# Altium PCB MVP-Module-Dash-v2.0.PcbDoc (part 1 of 6)
Units mil, origin at the board's own origin, x right, y up, seen from the top; angles counter-clockwise.
Board outline 5314.96 x 3937.01 mil, 4 copper layers (Top, GND, PWR, Bottom), stack 60.118 mil thick; 364 components, 288 nets, 1223 pads, 0 vias.
Unrouted connection lines stored in the file: 976.
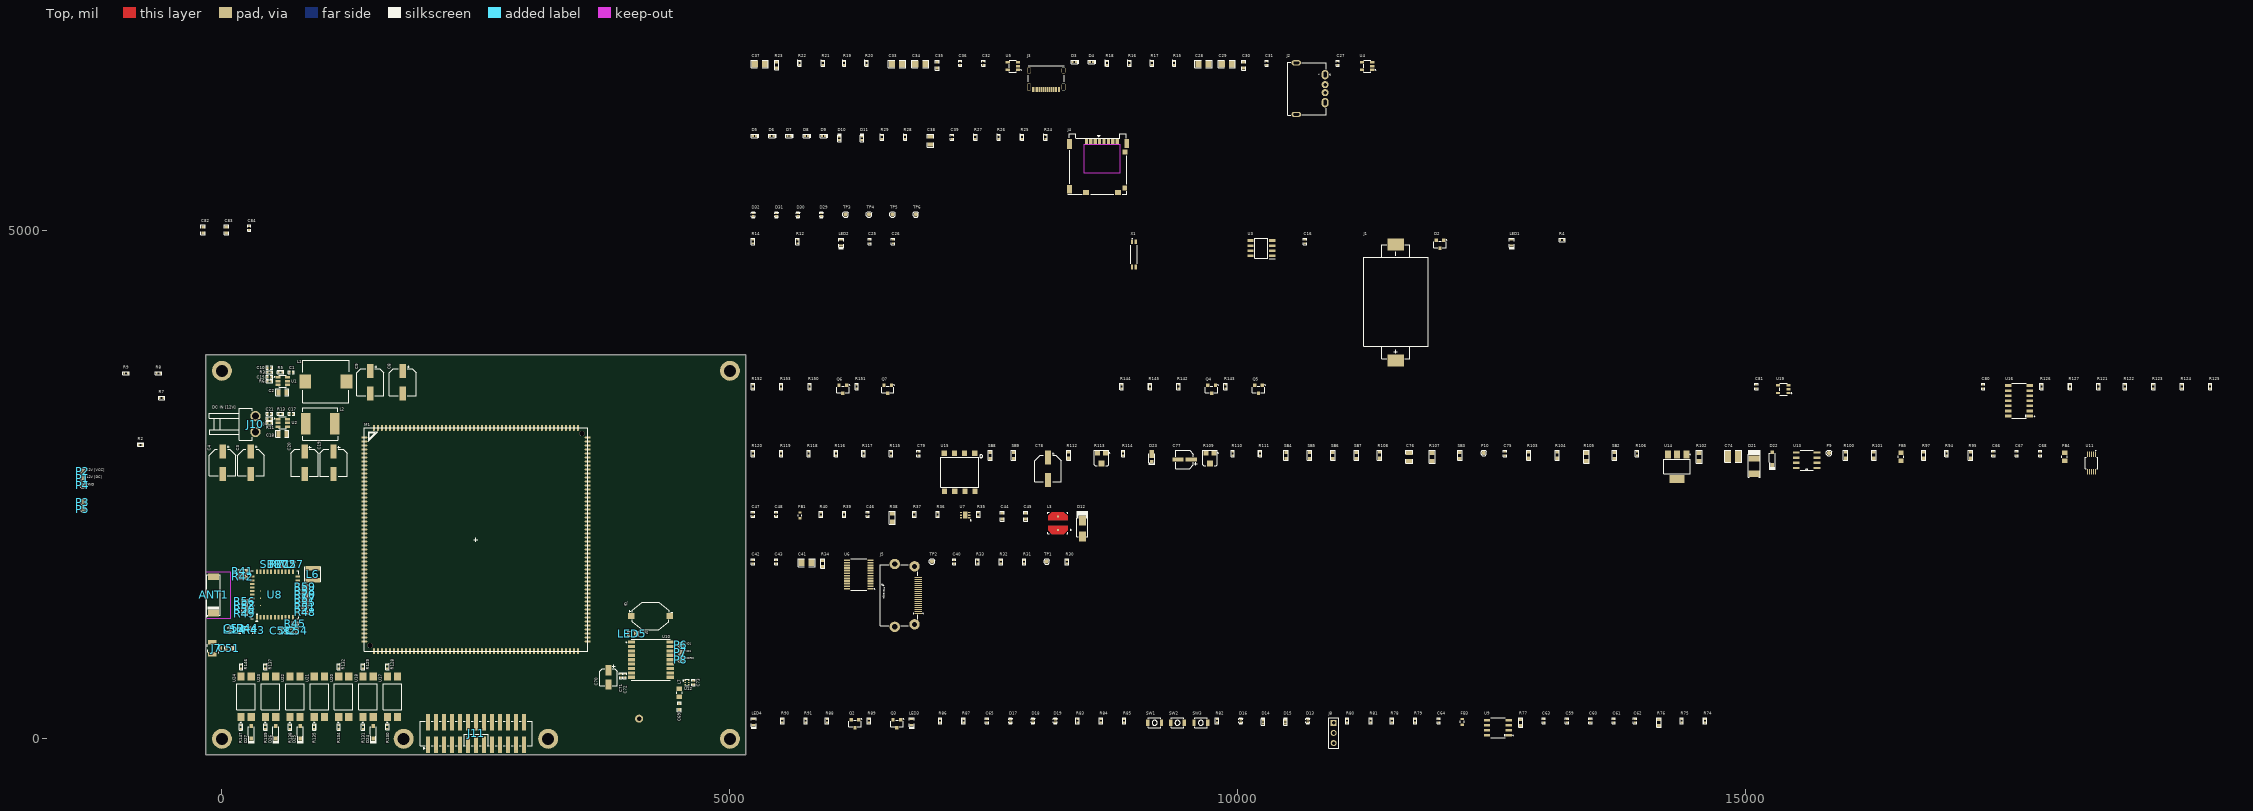
[diagram p0: Top view]
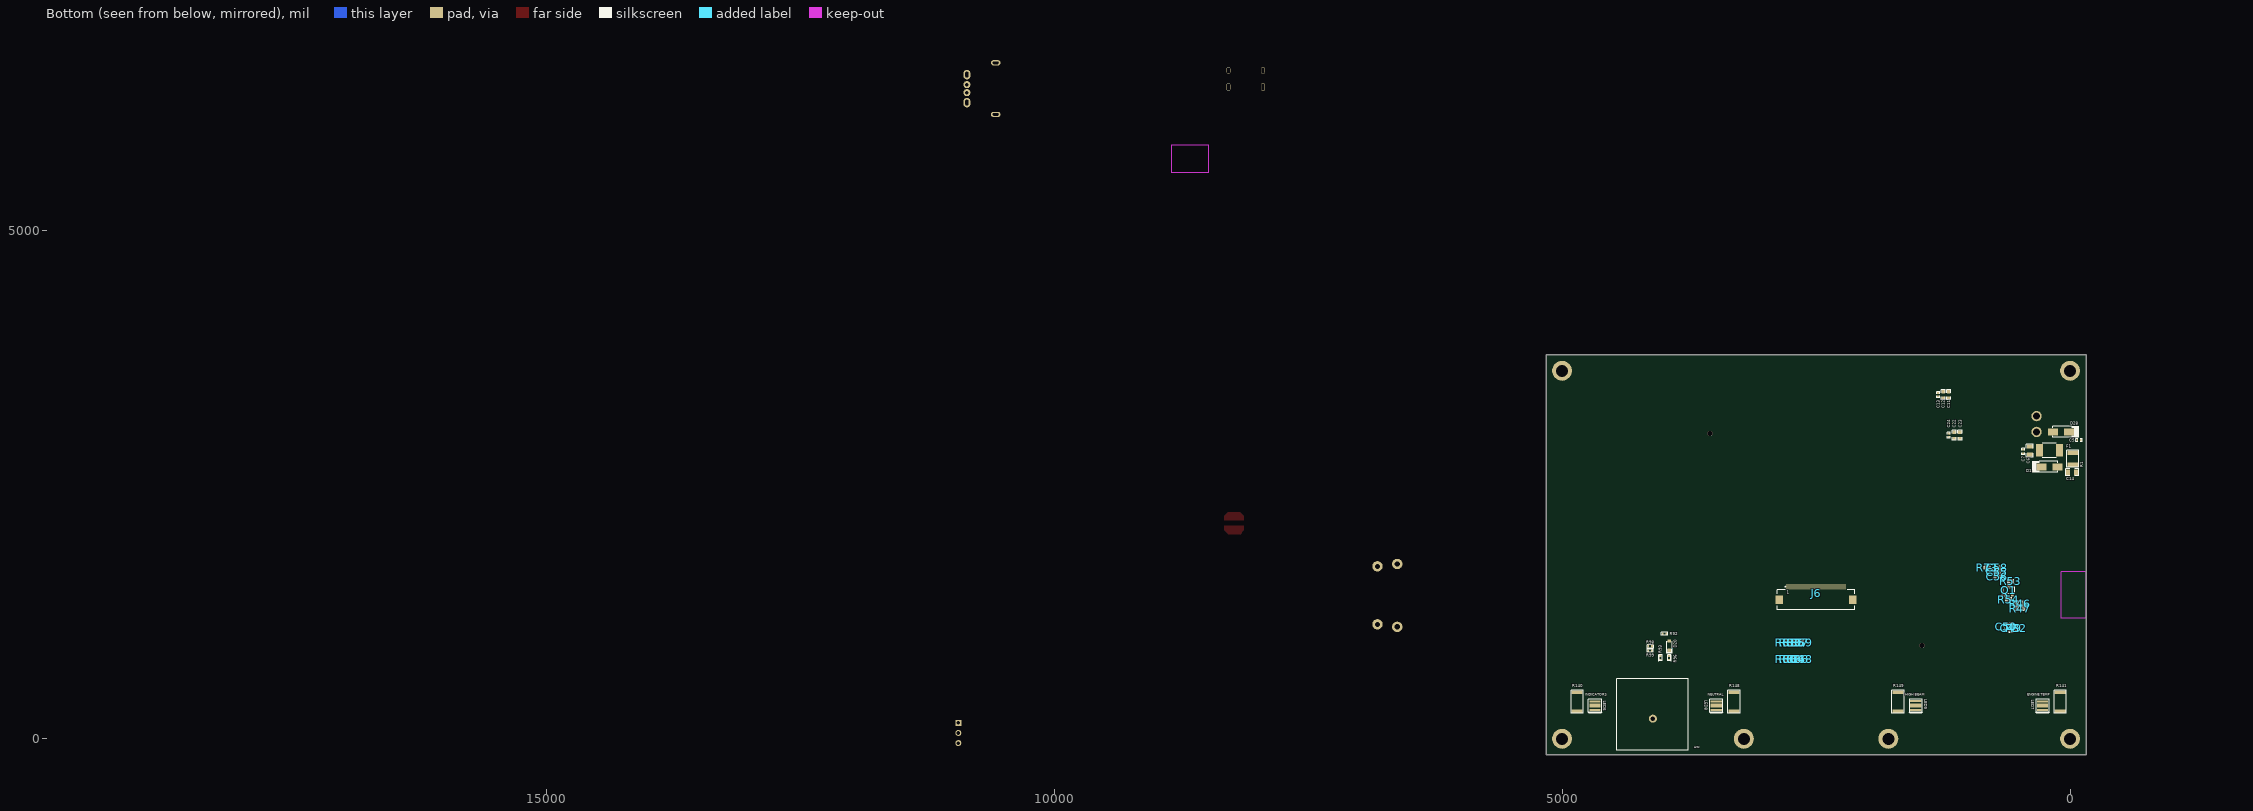
[diagram p1: Bottom view, seen from below]

## Layer stack, top to bottom
Top Solder: solder mask 1.5748, Solder Resist, Dk 3.5
Top: signal copper 0.689
Dielectric 1: prepreg 7.7165, PP-006, Dk 4.1
GND: signal copper 1.378
Core 02: prepreg 40.5512, FR-4, Dk 4.8
PWR: signal copper 1.378
Dielectric 2: prepreg 7.7165, PP-006, Dk 4.1
Bottom: signal copper 0.689
Bottom Solder: solder mask 1.5748, Solder Resist, Dk 3.5

## Board outline
-157.48,-157.48 5157.48,-157.48 5157.48,3779.53 -157.48,3779.53

## Design rules (kind name [scope] priority, off if disabled: settings)
Clearance Clearance_BGA [WithinRoom('Rockchip') OR WithinRoom('LPDDR4x')] p1: gap=4 ignorepadtopadclearanceinfootprint=FALSE
Clearance [All] p2: gap=5 ignorepadtopadclearanceinfootprint=FALSE
ComponentClearance [All] p1: gap=0 collisioncheckmode=3 verticalgap=0 showdistances=FALSE
DiffPairsRouting "MIPI 100OHM" [InDifferentialPairClass('MIPI')] p1: maxlimit=10 minlimit=5 mostfreqgap=5 toplayer_maxgap=5 toplayer_minwidth=5 toplayer_maxwidth=5 toplayer_prefwidth=5 bottomlayer_maxgap=5 bottomlayer_minwidth=5 bottomlayer_maxwidth=5 bottomlayer_prefwidth=5 impedanceprofiledriven=TRUE impedanceprofileid={6A727FEC-7230-4ECD-AF1B-DB85D48FF7C8} impedanceprofilevalue=100.000000 maxuncoupledlength=500
DiffPairsRouting "CAN 120OHM" [InDifferentialPairClass('CAN')] p2: maxlimit=10 minlimit=5 mostfreqgap=10 toplayer_mingap=10 toplayer_minwidth=5 toplayer_maxwidth=5 toplayer_prefwidth=5 bottomlayer_mingap=10 bottomlayer_minwidth=5 bottomlayer_maxwidth=5 bottomlayer_prefwidth=5 impedanceprofiledriven=TRUE impedanceprofileid={15A29312-FF26-4CC1-9788-E730C5FA9E7F} impedanceprofilevalue=120.000000 maxuncoupledlength=500
DiffPairsRouting "LPDDR4x DQS 100OHM" [InDifferentialPairClass('100OHM_DDR_DQS')] p3: maxlimit=9 minlimit=5 mostfreqgap=6 toplayer_maxgap=5 toplayer_prefgap=5 toplayer_minwidth=5 toplayer_maxwidth=5 toplayer_prefwidth=5 bottomlayer_maxgap=5 bottomlayer_prefgap=5 bottomlayer_minwidth=5 bottomlayer_maxwidth=5 bottomlayer_prefwidth=5 impedanceprofiledriven=TRUE impedanceprofileid={C2BF5852-FECA-45EF-94D3-E6317939363F} impedanceprofilevalue=100.000000 maxuncoupledlength=500
DiffPairsRouting "LPDDR4x CLK 100OHM" [InDifferentialPairClass('100OHM_DDR_CLK')] p4: maxlimit=9 minlimit=5 mostfreqgap=6 toplayer_maxgap=5 toplayer_prefgap=5 toplayer_minwidth=5 toplayer_maxwidth=5 toplayer_prefwidth=5 bottomlayer_maxgap=5 bottomlayer_prefgap=5 bottomlayer_minwidth=5 bottomlayer_maxwidth=5 bottomlayer_prefwidth=5 impedanceprofiledriven=TRUE impedanceprofileid={D17F236E-1DDD-45C0-BCE1-C69412D26291} impedanceprofilevalue=100.000000 maxuncoupledlength=500
DiffPairsRouting DiffPairs-USB90 [InDifferentialPairClass('USB')] p5: maxlimit=5 minlimit=5 mostfreqgap=5 toplayer_minwidth=6.8 toplayer_maxwidth=6.8 toplayer_prefwidth=9.27 bottomlayer_minwidth=6.8 bottomlayer_maxwidth=6.8 bottomlayer_prefwidth=9.27 impedanceprofiledriven=TRUE impedanceprofileid={DEE51EC6-B459-40BC-A745-2675CA147182} impedanceprofilevalue=90.000000 maxuncoupledlength=500
HoleSize [All] p1: absolutevalues=TRUE maxlimit=120 minlimit=1 maxpercent=80.000 minpercent=20.000
MatchedLengths "Schematic Matched Net Lengths_1" [InDifferentialPairClass('DIFF_HDMI_100')] p1: tolerance=20 checknetsindiffpair=TRUE checkdiffpairvsdiffpair=FALSE checkxsignals=FALSE checkothers=FALSE
MatchedLengths "Schematic Matched Net Lengths" [InDifferentialPairClass('HDMI100')] p2: tolerance=20 checknetsindiffpair=TRUE checkdiffpairvsdiffpair=FALSE checkxsignals=FALSE checkothers=FALSE
MatchedLengths [InDifferentialPairClass('MIPI')] p3: tolerance=12 checknetsindiffpair=TRUE checkdiffpairvsdiffpair=FALSE checkxsignals=FALSE checkothers=FALSE
MatchedLengths HDMI [InDifferentialPairClass('HDMI100')] p4: tolerance=10 checknetsindiffpair=TRUE checkdiffpairvsdiffpair=FALSE checkxsignals=FALSE checkothers=FALSE
MatchedLengths "DDR DQS" [InDifferentialPairClass('100OHM_DDR_DQS')] p5: tolerance=1000 checknetsindiffpair=FALSE checkdiffpairvsdiffpair=TRUE checkxsignals=TRUE checkothers=TRUE usedelayunits=TRUE delaytolerance=1.000000
MatchedLengths "DDR DataLines(DQ)" [InNetClass('A_DQ[15..0]') or InNetClass('B_DQ[15..0]')] p6: tolerance=1000 checknetsindiffpair=FALSE checkdiffpairvsdiffpair=TRUE checkxsignals=TRUE checkothers=TRUE usedelayunits=TRUE delaytolerance=5.000000
MatchedLengths "DDR CLK Matching" [InDifferentialPair('A_CLK') or InDifferentialPair('B_CLK')] p7: tolerance=1000 checknetsindiffpair=FALSE checkdiffpairvsdiffpair=TRUE checkxsignals=TRUE checkothers=TRUE usedelayunits=TRUE delaytolerance=5.000000
MatchedLengths "EMMC Delay Matching" [InNetClass('eMMC_DATA[7..0]')    OR InNet('eMMC_CLK')] p8: tolerance=20 checknetsindiffpair=FALSE checkdiffpairvsdiffpair=TRUE checkxsignals=TRUE checkothers=TRUE usedelayunits=TRUE delaytolerance=10.000000
MaxMinImpedance "Schematic Impedance Constraint_7" [InDifferentialPairClass('CAN')] p1: minimum=117.0 maximum=123.0
MaxMinImpedance "Schematic Impedance Constraint_6" [InDifferentialPairClass('HDMI100')] p2: minimum=98.00 maximum=102.0
MaxMinImpedance "Schematic Impedance Constraint_5" [InDifferentialPairClass('DIFF_HDMI_100')] p3: minimum=98.00 maximum=102.0
MaxMinImpedance "Schematic Impedance Constraint_4" [InDifferentialPairClass('MIPI')] p4: minimum=97.00 maximum=103.0
MaxMinImpedance "Schematic Impedance Constraint_3" [InDifferentialPairClass('USB')] p5: minimum=87.00 maximum=93.00
MinimumSolderMaskSliver [All] p1: minsoldermaskwidth=0
PolygonConnect [All] p1: thpad.connectstyle=Relief thpad.reliefconductorwidth=15 thpad.reliefentries=4 thpad.polygonreliefangle="45 Angle" thpad.airgapwidth=10 smdpad.connectstyle=Direct smdpad.reliefconductorwidth=15 smdpad.reliefentries=4 smdpad.polygonreliefangle="45 Angle" smdpad.airgapwidth=10 via.connectstyle=Direct via.reliefconductorwidth=15 via.reliefentries=4 via.polygonreliefangle="45 Angle" via.airgapwidth=10
RoutingVias RoutingVias_BGA [WithinRoom('Rockchip') OR WithinRoom('LPDDR4x')] p1: holewidth=6 width=12 viastyle="Through Hole" minholewidth=6 minwidth=12 maxholewidth=6 maxwidth=12
RoutingVias [All] p2: holewidth=7.87 width=15.75 viastyle="Through Hole" minholewidth=6 minwidth=12 maxholewidth=11.81 maxwidth=23.62
SilkToSilkClearance [All] p1: silktosilkclearance=0
SilkToSolderMaskClearance [IsPad] p1: minsilkscreentomaskgap=0 clearancetoexposedcopper=TRUE
SolderMaskExpansion [All] p1: expansion=4 istentingtop=FALSE
SupplyNets "Schematic Supply Nets_42" [InNet('VCC_3V3_LCD')] p1: voltage=0.000
SupplyNets "Schematic Supply Nets_41" [InNet('VCC_5V0')] p2: voltage=0.000
SupplyNets "Schematic Supply Nets_40" [InNet('HDMI1_VDISP')] p3: voltage=0.000
SupplyNets "Schematic Supply Nets_39" [InNet('VCC5V0_USB_OTG0')] p4: voltage=0.000
SupplyNets "Schematic Supply Nets_34" [InNet('DC_IN_12V')] p5: voltage=0.000
SupplyNets "Schematic Supply Nets_31" [InNet('VCC12V_DCIN')] p6: voltage=0.000
SupplyNets "Schematic Supply Nets_30" [InNet('VCC5V0_USB20_HOST')] p7: voltage=0.000
SupplyNets "Schematic Supply Nets_27" [InNet('VCC5V0_USB')] p8: voltage=0.000
SupplyNets "Schematic Supply Nets_22" [InNet('GND')] p9: voltage=0.000
SupplyNets "Schematic Supply Nets_21" [InNet('VCC3V3_SYS')] p10: voltage=0.000
SupplyNets "Schematic Supply Nets_20" [InNet('VCC5V0_SYS')] p11: voltage=0.000
SupplyNets "Schematic Supply Nets_10" [InNet('VCC_3V3')] p12: voltage=0.000
SupplyNets "Schematic Supply Nets_8" [InNet('VCC_1V8')] p13: voltage=0.000
SupplyNets "Schematic Supply Nets_6" [InNet('VCC3V3_SD')] p14: voltage=0.000
SupplyNets "Schematic Supply Nets_4" [InNet('VCCIO_WL')] p15: voltage=0.000
SupplyNets "Schematic Supply Nets_2" [InNet('LEDA')] p16: voltage=0.000
Width Width_BGA [WithinRoom('Rockchip') OR WithinRoom('LPDDR4x')] p1: maxlimit=10 minlimit=4 preferedwidth=5
Width [All] p2: maxlimit=50 minlimit=4.5 preferedwidth=15
24 further rules are at their usual default settings.

## Classes and differential pairs
differential pair class DIFF_HDMI_100: HDMI_TX0 HDMI_TX1 HDMI_TX2 HDMI_TXCLK
net class RF: NetR43_1
component class U_HDMI-Sheet: C40 C41 C42 C43 J5 R30 R31 R32 R33 R34 TP1 TP2 U6
component class U_Connector-Sheet: D28 J10 J11
differential pair class MIPI: MIPI_DSI_TX0_CLK MIPI_DSI_TX0_D0 MIPI_DSI_TX0_D1 MIPI_DSI_TX0_D2 MIPI_DSI_TX0_D3
differential pair class CAN: CANH
differential pair class HDMI100: HDMI_TX0 HDMI_TX1 HDMI_TX2 HDMI_TXCLK
differential pair class USB: TYPEC0 TYPEC0_RX1 TYPEC0_RX1D TYPEC0_RX2 TYPEC0_RX2D TYPEC0_TX1 TYPEC0_TX2 TYPEC0_TX2D TYPEC0TX1 TYPEC0TX2 USB2_HOST2_D USB2_HOST3_D USB3_OTG0_D USB3_OTG0_SSRX USB3_OTG0_SSTX
component class U_Peripherals-Sheet-2: C80 C81 D24 D25 D26 D27 LED6 LED7 LED8 LED9 Q4 Q5 Q6 Q7 R121 R122 R123 R124 R125 R126 R127 R128 R129 R130 R131 R132 R134 R135 R137 R138 R139 R140 R141 R142 R143 R144 R145 R146 R147 R148 R149 R150 R151 R152 R153 U16 U17 U18 U19 U20 U21 U22 U23 U24
component class U_CAN-Debug-Sheet: C59 C60 C61 C62 C63 C64 C65 D13 D14 D15 D16 D17 D18 D19 FB3 J8 LED3 LED4 Q2 Q3 R74 R75 R76 R77 R78 R79 R80 R81 R82 R83 R84 R85 R86 R87 R88 R89 R90 R91 SW1 SW2 SW3 U9
component class U_TF-Card-Sheet: C38 C39 D5 D6 D7 D8 D9 D10 D11 J4 R24 R25 R26 R27 R28 R29
component class U_TC-RK3568-Sheet: C82 C83 C84 D29 D30 D31 D32 M1 TP3 TP4 TP5 TP6
component class U_WiFi-Sheet: ANT1 C49 C50 C51 C52 C53 C54 C55 C56 C57 C58 FB2 J7 L4 L5 L6 Q1 R41 R42 R43 R44 R45 R46 R47 R48 R49 R50 R51 R52 R53 R54 R55 R56 R57 R58 R59 R60 R61 R62 R63 R64 R65 R66 R67 R68 R69 R70 R71 R72 R73 SB1 U8 X2
component class U_USB-Sheet: C27 C28 C29 C30 C31 C32 C33 C34 C35 C36 C37 D3 D4 J2 J3 R15 R16 R17 R18 R19 R20 R21 R22 R23 U4 U5
component class U_MIPI-Display-Sheet: C44 C45 C46 C47 C48 D12 FB1 J6 L3 R35 R36 R37 R38 R39 R40 U7
component class U_Power-Sheet: 4 C1 C2 C3 C4 C5 C6 C7 C8 C9 C10 C11 C12 C13 C14 C15 C16 C17 C18 C19 C20 C21 C22 C23 C24 C25 C26 D1 D2 F1 J1 L1 L2 LED1 LED2 P1 P2 P3 P4 P5 R1 R2 R3 R4 R5 R6 R7 R8 R9 R10 R11 R12 R13 R14 U1 U2 U3 X1
component class U_Peripherals-Sheet-1: Ant2 C66 C67 C68 C69 C70 C71 C72 C73 C74 C75 C76 C77 C78 C79 D20 D21 D22 D23 FB4 FB5 J9 L7 LED5 P6 P7 P8 P9 P10 R92 R93 R94 R95 R96 R97 R98 R99 R100 R101 R102 R103 R104 R105 R106 R107 R108 R109 R110 R111 R112 R113 R114 R115 R116 R117 R118 R119 R120 SB2 SB3 SB4 SB5 SB6 SB7 SB8 SB9 U10 U11 U12 U13 U14 U15
differential pair USB2_HOST2_D: +USB2_HOST2_D_P -USB2_HOST2_D_N
differential pair CANH: +CANH_P -CANH_N
differential pair USB3_OTG0_D: +USB3_OTG0_D_P -USB3_OTG0_D_N
differential pair MIPI_DSI_TX0_D3: +MIPI_DSI_TX0_D3_P -MIPI_DSI_TX0_D3_N
differential pair MIPI_DSI_TX0_D2: +MIPI_DSI_TX0_D2_P -MIPI_DSI_TX0_D2_N
differential pair MIPI_DSI_TX0_D1: +MIPI_DSI_TX0_D1_P -MIPI_DSI_TX0_D1_N
differential pair MIPI_DSI_TX0_D0: +MIPI_DSI_TX0_D0_P -MIPI_DSI_TX0_D0_N
differential pair MIPI_DSI_TX0_CLK: +MIPI_DSI_TX0_CLK_P -MIPI_DSI_TX0_CLK_N
differential pair HDMI_TXCLK: +HDMI_TXCLK_P -HDMI_TXCLK_N
differential pair HDMI_TX2: +HDMI_TX2_P -HDMI_TX2_N
differential pair HDMI_TX1: +HDMI_TX1_P -HDMI_TX1_N
differential pair HDMI_TX0: +HDMI_TX0_P -HDMI_TX0_N

## Components (designator, comment, footprint, x,y, rotation, side; value= is the part's Value field where it differs from the comment)
ANT1 "W3006" W3006_ -83,1415.93 r90 top locked
Ant2 "KH-GPS181804-WY" KH-GPS181804-WY 4105.54,197.71 r0 bottom
C1 "0.1uF" Cap-0402 682.35,3608.01 r180 top
C2 "10uF" Cap-0805 595.86,3408.54 r180 top
C3 "100uF" RVT1H101M0607 285,2717.76 r270 top
C4 "100uF" RVT1H101M0607 7.19,2717.76 r270 top
C5 "0.1uF" Cap-0402 -89,2939 r0 bottom
C6 "10uF" Cap-0805 395.79,2836.14 r90 bottom
C7 "0.1uF" Cap-0402 460,2828 r90 bottom
C8 "47uF" 25SVPF47M 1780,3510 r270 top
C9 "47uF" 25SVPF47M 1460,3510 r270 top
C10 "56pF" Cap-0402 466.65,3653.72 r180 top
C11 "22uF" Cap-0603 1193.13,3385.59 r90 bottom
C12 "22uF" Cap-0603 1248.53,3385.61 r90 bottom
C13 "0.1uF" Cap-0402 1298.13,3385.61 r90 bottom
C14 "2.2uF" Cap-0805 -20,2622.3 r180 bottom
C15 "0.1uF" Cap-0402 466.65,3561.1 r0 top
C16 "0.1uF" Cap-0402 10660.08,4895.13 r270 top
C17 "0.1uF" Cap-0402 683.32,3197.95 r180 top
C18 "10uF" Cap-0805 595.86,3001.34 r180 top
C19 "47uF" 25SVPF47M 1098.08,2717.76 r270 top
C20 "47uF" 25SVPF47M 813.08,2717.76 r270 top
C21 "47pF" Cap-0402 466.65,3197.95 r180 top
C22 "22uF" Cap-0603 1140.06,2986.99 r90 bottom
C23 "22uF" Cap-0603 1083.08,2986.98 r90 bottom
C24 "0.1uF" Cap-0402 1192.74,2986.99 r90 bottom
C25 "10pF" Cap-0402 6376.08,4895.13 r270 top
C26 "10pF" Cap-0402 6606.08,4895.13 r270 top
C27 "1uF" Cap-0402 10983.08,6649.13 r270 top
C28 "47uF" Cap-1206 9661.08,6641.13 r180 top
C29 "47uF" Cap-1206 9891.08,6641.13 r180 top
C30 "22uF" Cap-0603 10058.08,6631.13 r270 top
C31 "0.1uF" Cap-0402 10283.08,6649.13 r270 top
C32 "1uF" Cap-0402 7496.08,6649.13 r270 top
C33 "47uF" Cap-1206 6644.08,6641.13 r180 top
C34 "47uF" Cap-1206 6874.08,6641.13 r180 top
C35 "22uF" Cap-0603 7041.08,6631.13 r270 top
C36 "0.1uF" Cap-0402 7266.08,6649.13 r270 top
C37 "4.7nF" Cap-1206 5294.08,6641.13 r180 top
C38 "10uF" Cap-0805 6974.08,5888.13 r270 top
C39 "0.1uF" Cap-0402 7186.08,5921.13 r270 top
C40 "0.1uF" Cap-0402 7207.08,1742.13 r270 top
C41 "4.7nF" Cap-1206 5754.08,1734.13 r180 top
C42 "0.1uF" Cap-0402 5226.08,1742.13 r270 top
C43 "0.1uF" Cap-0402 5456.08,1742.13 r270 top
C44 "1uF" Cap-0603 7681.08,2191.13 r270 top
C45 "1uF" Cap-0603 7911.08,2191.13 r270 top
C46 "220nF" Cap-0402 6356.08,2209.13 r270 top
C47 "4.7uF" Cap-0402 5226.08,2209.13 r270 top
C48 "0.1uF" Cap-0402 5456.08,2209.13 r270 top
C49 "10uF" Cap-0603 578.95,1090.04 r90 bottom locked
C50 "0.1uF" Cap-0402 626.23,1101.54 r90 bottom locked
C51 "10pF" Cap-0603 71.99,889.74 r180 top locked
C52 "2.4pF" CAP-0201 125.41,1085.38 r180 top locked
C53 "12pF" Cap-0402 580.95,1063.38 r270 top locked
C54 "12pF" Cap-0402 741.7,1063.38 r90 top locked
C55 "1uF" Cap-0402 714.24,1640.17 r180 bottom locked
C56 "0.1uF" Cap-0402 714.24,1595.17 r0 bottom locked
C57 "4.7uF" Cap-0402 703.24,1717.48 r270 top locked
C58 "1uF" Cap-0402 714.24,1682.98 r180 bottom locked
C59 "4.7uF" Cap-0402 13239.08,177.13 r270 top
C60 "0.1uF" Cap-0402 13469.08,177.13 r270 top
C61 "0.1uF" Cap-0402 13699.08,177.13 r270 top
C62 "4.7uF" Cap-0402 13909.08,177.13 r270 top
C63 "4.7nF" Cap-0402 13009.08,177.13 r270 top
C64 "0.1uF" Cap-0402 11976.08,177.13 r270 top
C65 "0.1uF" Cap-0402 7530.08,177.13 r270 top
C66 "0.1uF" Cap-0402 17436.08,2808.13 r270 top
C67 "1uF" Cap-0402 17666.08,2808.13 r270 top
C68 "1uF" Cap-0402 17896.08,2808.13 r270 top
C69 "100pF" Cap-0603 4501.61,316.06 r270 top
C70 "10uF" RVT1E100M0405_ 3804.76,605.27 r270 top
C71 "0.1uF" Cap-0402 3924.46,621.02 r90 top
C72 "33nF" Cap-0402 3964.46,621.02 r90 top
C73 "0.1uF" Cap-0402 4641.15,553.38 r270 top
C74 "220nF" Cap-1210 14874.08,2780.13 r180 top
C75 "0.1uF" Cap-0402 12628.08,2808.13 r270 top
C76 "10nF" Cap-0805 11686.08,2775.13 r270 top
C77 "1uF" RVT1H1R0M0405 9474.08,2749.13 r180 top
C78 "10uF" 50SVPF10M 8130.08,2658.13 r270 top
C79 "0.1uF" Cap-0402 6856.08,2808.13 r270 top
C80 "0.1uF" Cap-0402 17335.08,3467.13 r270 top
C81 "0.1uF" Cap-0402 15103.08,3467.13 r270 top
C82 "22uF" Cap-0603 -186,5008 r270 top
C83 "22uF" Cap-0603 44,5008 r270 top
C84 "0.1uF" Cap-0402 269,5026 r270 top
D1 "SS34" SMA 200,2675.77 r180 bottom
D2 "BAT54C" SOT-23 11989.08,4867.13 r180 top
D3 "ESD5341N-2/TR" DFN1006-2L_ 8389.08,6662.13 r180 top
D4 "ESD5341N-2/TR" DFN1006-2L_ 8559.08,6662.13 r180 top
D5 "ESD5341N-2/TR" DFN1006-2L_ 5242.08,5934.13 r180 top
D6 "ESD5341N-2/TR" DFN1006-2L_ 5412.08,5934.13 r180 top
D7 "ESD5341N-2/TR" DFN1006-2L_ 5582.08,5934.13 r180 top
D8 "ESD5341N-2/TR" DFN1006-2L_ 5752.08,5934.13 r180 top
D9 "ESD5341N-2/TR" DFN1006-2L_ 5922.08,5934.13 r180 top
D10 "ESD5341N-2/TR" DFN1006-2L_ 6078.08,5910.13 r270 top
D11 "ESD5341N-2/TR" DFN1006-2L_ 6298.08,5910.13 r270 top
D12 "SS16" SMA 8469.08,2068.13 r270 top
D13 "ESD5451N" "DFN1006-2L (Bi-Directional)" 10688.08,177.13 r270 top
D14 "ESD5341N-2/TR" DFN1006-2L_ 10248.08,166.13 r270 top
D15 "ESD5341N-2/TR" DFN1006-2L_ 10468.08,166.13 r270 top
D16 "ESD5451N" "DFN1006-2L (Bi-Directional)" 10028.08,177.13 r270 top
D17 "ESD5451N" "DFN1006-2L (Bi-Directional)" 7762.08,177.13 r270 top
D18 "ESD5451N" "DFN1006-2L (Bi-Directional)" 7983.08,177.13 r270 top
D19 "ESD5451N" "DFN1006-2L (Bi-Directional)" 8203.08,177.13 r270 top
D20 "B5819WS" SOD-323 3944.46,917.42 r90 bottom
D21 "1N4007- SMD" SMA(DO-214AC) 15081.08,2684.13 r270 top
D22 "BZT52C16" SOD-123 15260.08,2757.13 r270 top
D23 "MSP3V3HM3/89A" MicroSMP 9152.08,2763.13 r270 top
D24 "1N4148W" SOD-123 1488.81,63.77 r270 top
D25 "1N4148W" SOD-123 768.81,63.77 r270 top
D26 "1N4148W" SOD-123 528.81,63.77 r270 top
D27 "1N4148W" SOD-123 288.21,63.77 r270 top
D28 "SS34" SMA 88,3020 r0 bottom
D29 "ESD5451N" "DFN1006-2L (Bi-Directional)" 5900.08,5158.13 r270 top
D30 "ESD5451N" "DFN1006-2L (Bi-Directional)" 5670.08,5158.13 r270 top
D31 "ESD5451N" "DFN1006-2L (Bi-Directional)" 5459.08,5158.13 r270 top
D32 "ESD5451N" "DFN1006-2L (Bi-Directional)" 5229.08,5158.13 r270 top
F1 "BSMD1812-300-24V" Fuse-1812_ 202.81,2839.23 r0 bottom
FB1 "BLM18PG181SN1D" "IND-0603 (1608 Metric)" 5688.08,2199.13 r270 top
FB2 "BLM18PG181SN1D" "IND-0603 (1608 Metric)" 529.77,1090.03 r90 bottom locked
FB3 "120R" "IND-0603 (1608 Metric)" 12208.08,167.13 r270 top
FB4 "MMZ2012R102ATD25" Ind-0805 18137.08,2775.13 r270 top
FB5 "MMZ2012R102ATD25" Ind-0805 16527.08,2775.13 r270 top
J1 "CR2032-BS-6-1" CR2032-BS-6-1 11553.08,4295.13 r270 top
J2 "U-A-24DD-Y-14" U-A-24DD-Y-14 10716.08,6399.13 r270 top
J3 "TYPE-C-31-M-12" TYPE-C-31-M-12_ 8113.08,6485.13 r180 top
J4 "TF-109" TF-109 8623.08,5628.13 r180 top
J5 "10029449-111RLF" 10029449-111RLF 6738.08,1411.13 r270 top
J6 "TF31-30S-0.5SH(800)" TF31-30S-0.5SH(800) 2500.04,1432.59 r180 bottom locked
J7 "U.FL-R-SMT-1(80)" U.FL-R-SMT-1(80)_ -58.01,890.74 r90 top locked
J8 "X6511WV-03H-C60D30" HDR1X3_ 10942.08,157.13 r270 top
J9 "PB-621SR13-TF" PB-621SR13-TF 4218.2,1208.76 r0 top
J10 "VH-2A" VH-2A 330,3098 r270 top
J11 "98424-G52-26ALF" 98424-G52-26ALF 2501.53,52.24 r0 top locked
L1 "4.7uH" YSPI1050-4R7M 1022.5,3518.32 r0 top
L2 "6.8uH" IHLP3232DZER6R8M11 967.74,3099 r0 top
L3 "22uH" IND_VLCF5020T-220MR75-1 8227.08,2123.13 r180 top
L4 "2.2nH" LQP03TG2N2B02D 172.23,1074.38 r90 top locked
L5 "1.8nH" LQP03TG2N2B02D 77.23,1074.38 r90 top locked
L6 "3.3uH" SPH4018H3R3MT_ 894.93,1618.79 r270 top locked
L7 "6.8nH" Ind-0805 4501.61,453.69 r270 top
LED1 "RED" LED-0603 12694.08,4882.13 r270 top
LED2 "RED" LED-0603 6094.08,4882.13 r270 top
LED3 "Yellow" LED-0603 6788.08,164.13 r270 top
LED4 "Red" LED-0603 5234.08,164.13 r270 top
LED5 "Emerald" LED-0603 4038.26,1032.54 r0 top
LED6 "WHITE" "GW CS8PM1.PM-LRLT-XX52-1-350-R18" 4676.15,325.6 r270 bottom
LED7 "WHITE" "GW CS8PM1.PM-LRLT-XX52-1-350-R18" 270.95,326.06 r270 bottom
LED8 "WHITE" "GW CS8PM1.PM-LRLT-XX52-1-350-R18" 3482.7,326.06 r270 bottom
LED9 "WHITE" "GW CS8PM1.PM-LRLT-XX52-1-350-R18" 1518.15,326.26 r270 bottom
M1 "TC-RK3568" CON_208P_X3568-MB 2500,1961.02 r0 top
P1 "TEST POINT 0.5mm Dia" "Test-point - 0.5mm" -1369.69,2563.15 r180 top
P2 "TEST POINT 0.5mm Dia" "Test-point - 0.5mm" -1370.08,2631.36 r180 top
P3 "TEST POINT 0.5mm Dia" "Test-point - 0.5mm" -1368.11,2329.93 r180 top
P4 "TEST POINT 0.5mm Dia" "Test-point - 0.5mm" -1370.03,2494.93 r180 top
P5 "TEST POINT 0.5mm Dia" "Test-point - 0.5mm" -1368.11,2260 r180 top
P6 "TEST POINT 0.5mm Dia" "Test-point - 0.5mm" 4516.54,922.88 r0 top
P7 "TEST POINT 0.5mm Dia" "Test-point - 0.5mm" 4516.54,849.36 r0 top
P8 "TEST POINT 0.5mm Dia" "Test-point - 0.5mm" 4516.54,778.5 r0 top
P9 "TEST POINT 0.5mm Dia" "Test-point - 0.5mm" 15817.08,2812.13 r180 top
P10 "TEST POINT 0.5mm Dia" "Test-point - 0.5mm" 12419.08,2812.13 r270 top
Q1 "2SK3018" SOT-23 602.89,1459.73 r180 bottom locked
Q2 "S8050" SOT-23 6231.08,149.13 r180 top
Q3 "S8050" SOT-23 6643.08,149.13 r180 top
Q4 "S8050" SOT-23 9741.08,3439.13 r180 top
Q5 "S8050" SOT-23 10202.08,3439.13 r180 top
Q6 "S8050" SOT-23 6111.08,3439.13 r180 top
Q7 "S8050" SOT-23 6553.08,3439.13 r180 top
R1 "2R" Res_1210 -26.79,2755.91 r90 bottom
R2 "240R" Res-0402 -800,2895 r180 top
R3 "93.1K" Res-0402 466.65,3607.5 r180 top
R4 "100K" Res-0402 13191.08,4910.13 r180 top
R5 "30.1K" Res-0402 575.04,3608.01 r180 top
R6 "18K" Res-0402 466.65,3520.01 r0 top
R7 "499R" Res-0402 -593.42,3355 r180 top
R8 "0R" Res-0402 -623.5,3597.5 r180 top
R9 "0R" Res-0402 -943.5,3597.5 r180 top
R10 "158K" Res-0402 466.65,3151.9 r180 top
R11 "10K" Res-0402 466.65,3108.91 r0 top
R12 "0R" Res-0402 5666.08,4895.13 r270 top
R13 "30.1K" Res-0402 576.01,3197.95 r180 top
R14 "0R" Res-0402 5226.08,4895.13 r270 top
R15 "2.2R" Res-0402 9373.08,6649.13 r270 top
R16 "0R" Res-0402 8933.08,6649.13 r270 top
R17 "4.7K" Res-0402 9153.08,6649.13 r270 top
R18 "2.2R" Res-0402 8713.08,6649.13 r270 top
R19 "0R" Res-0402 6126.08,6649.13 r270 top
R20 "4.7K" Res-0402 6346.08,6649.13 r270 top
R21 "5.1K" Res-0402 5916.08,6649.13 r270 top
R22 "5.1K" Res-0402 5686.08,6649.13 r270 top
R23 "1M" Res-0603 5461.08,6632.13 r270 top
R24 "22R" Res-0402 8106.08,5921.13 r270 top
R25 "22R" Res-0402 7876.08,5921.13 r270 top
R26 "22R" Res-0402 7646.08,5921.13 r270 top
R27 "22R" Res-0402 7416.08,5921.13 r270 top
R28 "22R" Res-0402 6726.08,5921.13 r270 top
R29 "100R" Res-0402 6496.08,5921.13 r270 top
R30 "10K" Res-0402 8317.08,1742.13 r270 top
R31 "10K" Res-0402 7897.08,1742.13 r270 top
R32 "DNP" Res-0402 7667.08,1742.13 r270 top
R33 "DNP" Res-0402 7437.08,1742.13 r270 top
R34 "1M" Res-0603 5914.08,1725.13 r270 top
R35 "1K" Res-0402 7446.08,2209.13 r270 top
R36 "DNP" Res-0402 7046.08,2209.13 r270 top
R37 "0R" Res-0402 6816.08,2209.13 r270 top
R38 "5.1R" RES-0805 6599.08,2176.13 r270 top
R39 "10K" Res-0402 6126.08,2209.13 r270 top
R40 "DNP" Res-0402 5896.08,2209.13 r270 top
R41 "15K" Res-0603 207,1649 r0 top locked value=15kR
R42 "20K" Res-0603 207,1595.17 r0 top locked
R43 "DNP" Res-0402 318.16,1068.03 r270 top locked
R44 "0R" Res-0402 255.73,1085.38 r180 top locked
R45 "22R" Res-0402 723.2,1133.78 r180 top locked
R46 "15K" Res-0603 489.42,1331.14 r0 bottom locked value=15kR
R47 "20K" Res-0603 489.42,1279.03 r0 bottom locked
R48 "10K" Res-0402 819.93,1243 r0 top locked
R49 "22R" Res-0402 224,1231.83 r180 top locked
R50 "0R" Res-0402 224,1272.76 r180 top locked
R51 "33R" Res-0402 819.93,1296.17 r180 top locked
R52 "0R" Res-0402 224,1313.76 r180 top locked
R53 "10K" Res-0402 584.39,1549.89 r180 bottom locked
R54 "10K" Res-0402 603.59,1370.63 r0 bottom locked
R55 "33R" Res-0402 819.93,1336.53 r180 top locked
R56 "22R" Res-0402 224,1354.13 r180 top locked
R57 "33R" Res-0402 819.93,1376.9 r180 top locked
R58 "33R" Res-0402 819.93,1457.63 r180 top locked
R59 "33R" Res-0402 819.93,1498 r180 top locked
R60 "30K" Res-0402 2795.28,785 r90 bottom
R61 "22R" Res-0402 2795.28,944 r90 bottom
R62 "30K" Res-0402 2755.91,785 r90 bottom
R63 "22R" Res-0402 2755.91,944 r90 bottom
R64 "30K" Res-0402 2716.54,785 r90 bottom
R65 "22R" Res-0402 2716.54,944 r90 bottom
R66 "30K" Res-0402 2677.17,785 r90 bottom
R67 "22R" Res-0402 2677.17,944 r90 bottom
R68 "30K" Res-0402 2637.8,785 r90 bottom
R69 "22R" Res-0402 2637.8,944 r90 bottom
R70 "22R" Res-0402 819.93,1417.27 r180 top locked
R71 "10K" Res-0402 580.95,1717.48 r90 top locked
R72 "22R" Res-0402 626.23,1717.48 r270 top locked
R73 "0R" Res-0402 814.93,1682.98 r180 bottom locked
R74 "100R" Res-0402 14599.08,177.13 r270 top
R75 "100R" Res-0402 14369.08,177.13 r270 top
R76 "60.4R" Res-0603 14144.08,160.13 r270 top
R77 "60.4R" Res-0603 12784.08,160.13 r270 top
R78 "22R" Res-0402 11516.08,177.13 r270 top
R79 "0R" Res-0402 11746.08,177.13 r270 top
R80 "22R" Res-0402 11077.08,177.13 r270 top
R81 "0R" Res-0402 11307.08,177.13 r270 top
R82 "4.7K" Res-0402 9795.08,177.13 r270 top
R83 "100R" Res-0402 8421.08,177.13 r270 top
R84 "100R" Res-0402 8651.08,177.13 r270 top
R85 "100R" Res-0402 8881.08,177.13 r270 top
R86 "100R" Res-0402 7070.08,177.13 r270 top
R87 "100R" Res-0402 7300.08,177.13 r270 top
R88 "10K" Res-0402 5956.08,177.13 r270 top
R89 "10K" Res-0402 6368.08,177.13 r270 top
R90 "100K" Res-0402 5516.08,177.13 r270 top
R91 "100K" Res-0402 5746.08,177.13 r270 top
R92 "100R" Res-0402 3990.23,1032.54 r0 bottom
R93 "0R" Res-0402 4031.5,797 r270 bottom
R94 "10K" Res-0402 16976.08,2808.13 r270 top
R95 "10K" Res-0603 17211.08,2791.13 r270 top value=10kR
R96 "1.5K" Res-0402 3944.46,797 r90 bottom
R97 "2.7K" Res-0603 16751.08,2791.13 r270 top
R98 "0R" Res-0402 4132.49,908.42 r180 bottom
R99 "0R" Res-0402 4132.49,865.11 r0 bottom
R100 "470R" Res-0603 15981.08,2791.13 r270 top
R101 "10R" Res-0603 16260.08,2791.13 r270 top
R102 "100K" RES-0805 14539.08,2775.13 r270 top
R103 "22K" Res-0603 12863.08,2791.13 r270 top
R104 "47K" Res-0603 13143.08,2791.13 r270 top
R105 "1M" RES-0805 13431.08,2775.13 r270 top value=1MR
R106 "10K" Res-0402 13928.08,2808.13 r270 top
R107 "0R" Res-0805 11911.08,2775.13 r270 top
R108 "75R" Res-0603 11394.08,2791.13 r270 top
R109 "100k" TC33X-2-104E_ 9764.08,2811.13 r180 top
R110 "200K" Res-0402 9949.08,2808.13 r270 top
R111 "100K" Res-0402 10219.08,2808.13 r270 top
R112 "22K" Res-0603 8335.08,2791.13 r270 top
R113 "100k" TC33X-2-104E_ 8696.08,2811.13 r180 top
R114 "10K" Res-0402 8871.08,2808.13 r270 top
R115 "1.8K" Res-0402 6586.08,2808.13 r270 top
R116 "10K" Res-0402 6046.08,2808.13 r270 top
R117 "0R" Res-0402 6316.08,2808.13 r270 top
R118 "470R" Res-0402 5776.08,2808.13 r270 top
R119 "49.9K" Res-0402 5506.08,2808.13 r270 top value=49.9kR
R120 "0R" Res-0402 5226.08,2808.13 r270 top
R121 "1K" Res-0402 18471.08,3467.13 r270 top
R122 "1K" Res-0402 18731.08,3467.13 r270 top
R123 "1K" Res-0402 19011.08,3467.13 r270 top
R124 "1K" Res-0402 19291.08,3467.13 r270 top
R125 "1K" Res-0402 19571.08,3467.13 r270 top
R126 "1K" Res-0402 17911.08,3467.13 r270 top
R127 "1K" Res-0402 18191.08,3467.13 r270 top
R128 "1K" Res-0402 1628.81,709.7 r90 top
R129 "1K" Res-0402 1388,709.7 r90 top
R130 "1K" Res-0402 1628.81,117.77 r90 top
R131 "1K" Res-0402 1388.81,114.7 r90 top
R132 "1K" Res-0402 1148.81,709.7 r90 top
R134 "1K" Res-0402 1148.81,114.7 r90 top
R135 "1K" Res-0402 908.81,114.7 r90 top
R137 "1K" Res-0402 428.81,709.7 r90 top
R138 "1K" Res-0402 668.81,114.7 r90 top
R139 "1K" Res-0402 428.81,114.7 r90 top
R140 "22R" RES-2010 4851.64,364.92 r270 bottom
R141 "22R" RES-2010 96,364.92 r270 bottom
R142 "4.7K" Res-0402 9416.08,3467.13 r270 top
R143 "4.7K" Res-0402 9878.08,3467.13 r270 top
R144 "47K" Res-0402 8856.08,3467.13 r270 top
R145 "47K" Res-0402 9136.08,3467.13 r270 top
R146 "1K" Res-0402 189,709.7 r90 top
R147 "1K" Res-0402 185.7,114.7 r90 top
R148 "22R" RES-2010 3307.75,364.92 r270 bottom
R149 "22R" RES-2010 1693.64,364.92 r270 bottom
R150 "4.7K" Res-0402 5786.08,3467.13 r270 top
R151 "4.7K" Res-0402 6248.08,3467.13 r270 top
R152 "47K" Res-0402 5226.08,3467.13 r270 top
R153 "47K" Res-0402 5506.08,3467.13 r270 top
SB1 "Solder Bridge 0402" "Solder Bridge 0402" 484.49,1717.48 r90 top locked
SB2 "Solder Bridge 0603" "Solder Bridge" 13704.08,2789.13 r270 top
SB3 "Solder Bridge 0603" "Solder Bridge" 12184.08,2789.13 r270 top
SB4 "Solder Bridge 0603" "Solder Bridge" 10475.08,2789.13 r270 top
SB5 "Solder Bridge 0603" "Solder Bridge" 10705.08,2789.13 r270 top
SB6 "Solder Bridge 0603" "Solder Bridge" 10935.08,2789.13 r270 top
SB7 "Solder Bridge 0603" "Solder Bridge" 11165.08,2789.13 r270 top
SB8 "Solder Bridge 0603" "Solder Bridge" 7562.08,2789.13 r270 top
SB9 "Solder Bridge 0603" "Solder Bridge" 7792.08,2789.13 r270 top
SW1 "B3U-1000P" B3U-1000P 9180.08,157.13 r180 top
SW2 "B3U-1000P" B3U-1000P 9405.08,157.13 r180 top
SW3 "B3U-1000P" B3U-1000P 9635.08,157.13 r180 top
TP1 "TEST POINT 0.5mm Dia" "Test-point - 0.5mm" 8118.08,1746.13 r270 top
TP2 "TEST POINT 0.5mm Dia" "Test-point - 0.5mm" 6988.08,1746.13 r270 top
TP3 "TEST POINT 0.5mm Dia" "Test-point - 0.5mm" 6139.08,5162.13 r270 top
TP4 "TEST POINT 0.5mm Dia" "Test-point - 0.5mm" 6369.08,5162.13 r270 top
TP5 "TEST POINT 0.5mm Dia" "Test-point - 0.5mm" 6599.08,5162.13 r270 top
TP6 "TEST POINT 0.5mm Dia" "Test-point - 0.5mm" 6829.08,5162.13 r270 top
U1 "AP63300WU-7" TSOT-23-6 597.49,3520 r0 top
U2 "AP63300WU-7" TSOT-23-6 599.09,3108.9 r0 top
U3 "PCF8563T/F4,118" PCF8563T/F4,118 10230.08,4829.13 r180 top
U4 "SY6280AAC" SOT-23-5 11272.08,6621.13 r180 top
U5 "SY6280AAC" SOT-23-5 7784.08,6621.13 r180 top
U6 "TPD12S016PWR" 24-TSSOP 6268.08,1617.13 r180 top
U7 "TPS61161ADRVR" TPS61161ADRVR 7315.08,2201.13 r180 top
U8 "AP6256" AP6256_ 519.93,1418 r90 top locked
U9 "TCAN1044VDRQ1" "SOIC-8(0.154\", 3.90mm Width)" 12559.08,109.13 r180 top
U10 "ATGM336H-6N-74" ATGM336H-6N-74 4221.5,778.5 r180 top
U11 "ADS1115IDGSR" VSSOP-10 18401.08,2714.13 r270 top
U12 "AT2659" DFN-6(1x1.6) 4576.47,553.38 r0 top
U13 "LM2917MX-8_NOPB" SOIC127P600X175-8N 15598.08,2741.13 r180 top
U14 "LM317MDCYR" "SOT- 223" 14322.08,2678.13 r180 top
U15 "6N137S" 8-SMD 7254.08,2615.13 r180 top
U16 "SN74HC14QDRQ1" SOIC-14 17689.08,3326.13 r180 top
U17 "PC817C" PC817C 1678.81,412.7 r90 top
U18 "PC817C" PC817C 1438.81,412.7 r90 top
U19 "74LVC1G17GV,125" SC-74A 15369.08,3440.13 r180 top
U20 "PC817C" PC817C 1198.81,412.7 r90 top
U21 "PC817C" PC817C 958.81,412.7 r90 top
U22 "PC817C" PC817C 718.8,412.7 r90 top
U23 "PC817C" PC817C 478.8,412.7 r90 top
U24 "PC817C" PC817C 237.7,412.7 r90 top
X1 "32.768kHz" MC-146_ 8975.08,4768.13 r270 top
X2 "37.4MHz" Q22FA12800078_ 662.13,1063.88 r0 top locked

## Footprints (in the part's own frame and the unit in brackets; to place one, negate y for a bottom-side part, rotate by r counter-clockwise, add the part's x,y. Pads: shape width x height; smd on the part's side, far side on the other; paste and mask are expansions set on the pad)
8-SMD [mm]
  rect 1.3x1.4 smd: 1(-3.96,-4.96) 2(-1.42,-4.96) 3(1.12,-4.96) 4(3.66,-4.96) 5(3.59,4.58) 6(1.05,4.58) 7(-1.49,4.58) 8(-4.03,4.58)
  silkscreen extent -5.92,-4.6 4.57,3.56, body extent -4.99,-5.22 4.69,4.94, height 4.6
24-TSSOP [mm]
  rect 1.5x0.45 smd: 1(-2.9,3.575) 2(-2.9,2.925) 3(-2.9,2.275) 4(-2.9,1.625) 5(-2.9,0.975) 6(-2.9,0.325) 7(-2.9,-0.325) 8(-2.9,-0.975) 9(-2.9,-1.625) 10(-2.9,-2.275) 11(-2.9,-2.925) 12(-2.9,-3.575) 13(2.9,-3.575) 14(2.9,-2.925) 15(2.9,-2.275) 16(2.9,-1.625) 17(2.9,-0.975) 18(2.9,-0.325) 19(2.9,0.325) 20(2.9,0.975) 21(2.9,1.625) 22(2.9,2.275) 23(2.9,2.925) 24(2.9,3.575)
  silkscreen extent -3.94,-3.96 1.96,3.96, body extent -3.2,-3.9 3.2,3.9, height 1.2
25SVPF47M [mm]
  rect 3.5x1.6 smd: 1(-2.8,0) 2(2.8,0)
  silkscreen extent -4.11,-3.4 3.4,3.4, body extent -3.65,-3.3 3.65,3.3, height 6
50SVPF10M [mm]
  rect 3.5x1.6 smd: 1(-2.8,0) 2(2.8,0)
  silkscreen extent -4.01,-3.3 3.3,3.3, body extent -3.65,-3.3 3.65,3.3, height 5.9
98424-G52-26ALF [mm]
  rect 1x4.1 smd paste+0 mask+0.051: 1(-12,-2.8) 2(-12,2.8) 3(-10,-2.8) 4(-10,2.8) 5(-8,-2.8) 6(-8,2.8) 7(-6,-2.8) 8(-6,2.8) 9(-4,-2.8) 10(-4,2.8) 11(-2,-2.8) 12(-2,2.8) 13(0,-2.8) 14(0,2.8) 15(2,-2.8) 16(2,2.8) 17(4,-2.8) 18(4,2.8) 19(6,-2.8) 20(6,2.8) 21(8,-2.8) 22(8,2.8) 23(10,-2.8) 24(10,2.8) 25(12,-2.8) 26(12,2.8)
  silkscreen extent -14,-4.01 14,3.05, body extent -14,-4.5 14,4.5, height 6.2
10029449-111RLF [mm]
  rect 0.3x1.9 smd: 1(4.5,2.95) 2(4,2.95) 3(3.5,2.95) 4(3,2.95) 5(2.5,2.95) 6(2,2.95) 7(1.5,2.95) 8(1,2.95) 9(0.5,2.95) 10(0,2.95) 11(-0.5,2.95) 12(-1,2.95) 13(-1.5,2.95) 14(-2,2.95) 15(-2.5,2.95) 16(-3,2.95) 17(-3.5,2.95) 18(-4,2.95) 19(-4.5,2.95)
  round 2.6 hole 1.3: S1(-7.85,-2.95) S2(-7.25,2) S3(7.25,2) S4(7.85,-2.95)
  silkscreen extent -7.62,-6.6 7.62,4.22, body extent -8.35,-6.55 7.85,3.55, height 6.28
AP6256_ [mm]
  rect 1.125x0.5 smd: 1(-5.687,4.5) 2(-5.687,3.6) 3(-5.687,2.7) 4(-5.687,1.8) 5(-5.687,0.9) 6(-5.687,0) 7(-5.687,-0.9) 8(-5.687,-1.8) 9(-5.687,-2.7) 10(-5.687,-3.6) 11(-5.687,-4.5) 23(5.688,-4.5) 24(5.688,-3.6) 25(5.688,-2.7) 26(5.688,-1.8) 27(5.688,-0.9) 28(5.688,0) 29(5.688,0.9) 30(5.688,1.8) 31(5.688,2.7) 32(5.688,3.6) 33(5.688,4.5)
  rect 0.5x1.125 smd: 12(-4.5,-5.687) 13(-3.6,-5.687) 14(-2.7,-5.687) 15(-1.8,-5.687) 16(-0.9,-5.687) 17(0,-5.687) 18(0.9,-5.687) 19(1.8,-5.687) 20(2.7,-5.687) 21(3.6,-5.687) 22(4.5,-5.687) 34(4.5,5.687) 35(3.6,5.687) 36(2.7,5.687) 37(1.8,5.687) 38(0.9,5.687) 39(0,5.687) 40(-0.9,5.687) 41(-1.8,5.687) 42(-2.7,5.687) 43(-3.6,5.687) 44(-4.5,5.687)
  round 0.3 smd: 45(0.9,3.6) 46(-0.9,3.6) 47(-2.7,3.6)
  silkscreen extent -6.68,-6.05 6.05,6.05, body extent -6,-6 6,6, height 1.55
ATGM336H-6N-74 [mm]
  rect 1.8x0.8 smd: 1(4.85,-4.4) 2(4.85,-3.3) 3(4.85,-2.2) 4(4.85,-1.1) 5(4.85,0) 6(4.85,1.1) 7(4.85,2.2) 8(4.85,3.3) 9(4.85,4.4) 10(-4.85,4.4) 11(-4.85,3.3) 12(-4.85,2.2) 13(-4.85,1.1) 14(-4.85,0) 15(-4.85,-1.1) 16(-4.85,-2.2) 17(-4.85,-3.3) 18(-4.85,-4.4)
  silkscreen extent -4.9,-5.1 6.1,5.1, body extent -4.85,-5.05 4.85,5.05, height 2.57
B3U-1000P [mm] "SWITCH TACTILE SPST-NO 0.05A 12V"
  rect 0.82x1.72 smd: 1(-1.7,0) 2(1.7,0)
  silkscreen extent -1.57,-1.3 1.57,1.3, body extent -2,-1.26 2,1.24, height 1.6
CAP-0201 [mm]
  rect 0.3x0.3 smd mask+0.055: 1(-0.3,0) 2(0.3,0)
  silkscreen extent -0.53,-0.23 0.53,0.23, body extent -0.3,-0.15 0.3,0.15, height 0.28
Cap-0402 [mil]
  rect 18x25 smd mask+2.36: 1(-18.5,0) 2(18.5,0)
  silkscreen extent -31,-16 31,16, body extent -20,-10 20,10, height 19
Cap-0603 [mil]
  rect 30x35 smd mask+2.36: 1(-30,0) 2(30,0)
  silkscreen extent -49,-21 49,21, body extent -32,-16 31,16, height 34
Cap-0805 [mil] "SMD 0805"
  rect 40x60 smd mask+2.76: 1(-40,0) 2(40,0)
  silkscreen extent -64,-34 64,34, body extent -39,-25 39,25, height 30
Cap-1206 [mil] "SMD 1206"
  rect 60x70 smd: 1(-50,0) 2(50,0)
  silkscreen extent -84,-39 84,39, body extent -63,-31 63,32, height 39
Cap-1210 [mil] "SMD 1210"
  rect 60x110 smd: 1(-50,0) 2(50,0)
  silkscreen extent -84,-59 84,59, body extent -63,-49 63,49, height 39
CON_208P_X3568-MB [mm]
  oval 1.5x0.5 smd: 1(-27.9,25.5) 2(-27.9,24.5) 3(-27.9,23.5) 4(-27.9,22.5) 5(-27.9,21.5) 6(-27.9,20.5) 7(-27.9,19.5) 8(-27.9,18.5) 9(-27.9,17.5) 10(-27.9,16.5) 11(-27.9,15.5) 12(-27.9,14.5) 13(-27.9,13.5) 14(-27.9,12.5) 15(-27.9,11.5) 16(-27.9,10.5) 17(-27.9,9.5) 18(-27.9,8.5) 19(-27.9,7.5) 20(-27.9,6.5) 21(-27.9,5.5) 22(-27.9,4.5) 23(-27.9,3.5) 24(-27.9,2.5) 25(-27.9,1.5) 26(-27.9,0.5) 27(-27.9,-0.5) 28(-27.9,-1.5) 29(-27.9,-2.5) 30(-27.9,-3.5) 31(-27.9,-4.5) 32(-27.9,-5.5) 33(-27.9,-6.5) 34(-27.9,-7.5) 35(-27.9,-8.5) 36(-27.9,-9.5) 37(-27.9,-10.5) 38(-27.9,-11.5) 39(-27.9,-12.5) 40(-27.9,-13.5) 41(-27.9,-14.5) 42(-27.9,-15.5) 43(-27.9,-16.5) 44(-27.9,-17.5) 45(-27.9,-18.5) 46(-27.9,-19.5) 47(-27.9,-20.5) 48(-27.9,-21.5) 49(-27.9,-22.5) 50(-27.9,-23.5) 51(-27.9,-24.5) 52(-27.9,-25.5) 105(27.9,-25.5) 106(27.9,-24.5) 107(27.9,-23.5) 108(27.9,-22.5) 109(27.9,-21.5) 110(27.9,-20.5) 111(27.9,-19.5) 112(27.9,-18.5) 113(27.9,-17.5) 114(27.9,-16.5) 115(27.9,-15.5) 116(27.9,-14.5) 117(27.9,-13.5) 118(27.9,-12.5) 119(27.9,-11.5) 120(27.9,-10.5) 121(27.9,-9.5) 122(27.9,-8.5) 123(27.9,-7.5) 124(27.9,-6.5) 125(27.9,-5.5) 126(27.9,-4.5) 127(27.9,-3.5) 128(27.9,-2.5) 129(27.9,-1.5) 130(27.9,-0.5) 131(27.9,0.5) 132(27.9,1.5) 133(27.9,2.5) 134(27.9,3.5) 135(27.9,4.5) 136(27.9,5.5) 137(27.9,6.5) 138(27.9,7.5) 139(27.9,8.5) 140(27.9,9.5) 141(27.9,10.5) 142(27.9,11.5) 143(27.9,12.5) 144(27.9,13.5) 145(27.9,14.5) 146(27.9,15.5) 147(27.9,16.5) 148(27.9,17.5) 149(27.9,18.5) 150(27.9,19.5) 151(27.9,20.5) 152(27.9,21.5) 153(27.9,22.5) 154(27.9,23.5) 155(27.9,24.5) 156(27.9,25.5)
  oval 0.5x1.5 smd: 53(-25.5,-27.9) 54(-24.5,-27.9) 55(-23.5,-27.9) 56(-22.5,-27.9) 57(-21.5,-27.9) 58(-20.5,-27.9) 59(-19.5,-27.9) 60(-18.5,-27.9) 61(-17.5,-27.9) 62(-16.5,-27.9) 63(-15.5,-27.9) 64(-14.5,-27.9) 65(-13.5,-27.9) 66(-12.5,-27.9) 67(-11.5,-27.9) 68(-10.5,-27.9) 69(-9.5,-27.9) 70(-8.5,-27.9) 71(-7.5,-27.9) 72(-6.5,-27.9) 73(-5.5,-27.9) 74(-4.5,-27.9) 75(-3.5,-27.9) 76(-2.5,-27.9) 77(-1.5,-27.9) 78(-0.5,-27.9) 79(0.5,-27.9) 80(1.5,-27.9) 81(2.5,-27.9) 82(3.5,-27.9) 83(4.5,-27.9) 84(5.5,-27.9) 85(6.5,-27.9) 86(7.5,-27.9) 87(8.5,-27.9) 88(9.5,-27.9) 89(10.5,-27.9) 90(11.5,-27.9) 91(12.5,-27.9) 92(13.5,-27.9) 93(14.5,-27.9) 94(15.5,-27.9) 95(16.5,-27.9) 96(17.5,-27.9) 97(18.5,-27.9) 98(19.5,-27.9) 99(20.5,-27.9) 100(21.5,-27.9) 101(22.5,-27.9) 102(23.5,-27.9) 103(24.5,-27.9) 104(25.5,-27.9) 157(25.5,27.9) 158(24.5,27.9) 159(23.5,27.9) 160(22.5,27.9) 161(21.5,27.9) 162(20.5,27.9) 163(19.5,27.9) 164(18.5,27.9) 165(17.5,27.9) 166(16.5,27.9) 167(15.5,27.9) 168(14.5,27.9) 169(13.5,27.9) 170(12.5,27.9) 171(11.5,27.9) 172(10.5,27.9) 173(9.5,27.9) 174(8.5,27.9) 175(7.5,27.9) 176(6.5,27.9) 177(5.5,27.9) 178(4.5,27.9) 179(3.5,27.9) 180(2.5,27.9) 181(1.5,27.9) 182(0.5,27.9) 183(-0.5,27.9) 184(-1.5,27.9) 185(-2.5,27.9) 186(-3.5,27.9) 187(-4.5,27.9) 188(-5.5,27.9) 189(-6.5,27.9) 190(-7.5,27.9) 191(-8.5,27.9) 192(-9.5,27.9) 193(-10.5,27.9) 194(-11.5,27.9) 195(-12.5,27.9) 196(-13.5,27.9) 197(-14.5,27.9) 198(-15.5,27.9) 199(-16.5,27.9) 200(-17.5,27.9) 201(-18.5,27.9) 202(-19.5,27.9) 203(-20.5,27.9) 204(-21.5,27.9) 205(-22.5,27.9) 206(-23.5,27.9) 207(-24.5,27.9) 208(-25.5,27.9)
  round 1.2 hole 1.2 unplated: 209(26.5,26.5) 210(-26.5,-26.5)
  silkscreen extent -27.9,-27.9 27.9,27.9
CR2032-BS-6-1 [mm]
  rect 3x4.2 smd: 1(14.5,0) 2(-14.5,0)
  silkscreen extent -14.41,-8.03 14.09,8.12, body extent -15.65,-8 15.65,8, height 5.6
"DFN1006-2L (Bi-Directional)" [mm]
  rect 0.4x0.7 smd paste+0 mask+0.051: 1(-0.325,0) 2(0.325,0)
  silkscreen extent -0.78,-0.47 0.78,0.47, body extent -0.5,-0.3 0.5,0.3, height 0.47
DFN1006-2L_ [mm]
  rect 0.55x0.66 smd: 1(-0.425,0) 2(0.425,0)
  silkscreen extent -1.14,-0.51 0.81,0.51, body extent -0.5,-0.3 0.5,0.3, height 0.47
DFN-6(1x1.6) [mm]
  rect 0.425x0.28 smd: 1(-0.437,0.5) 2(-0.437,0) 3(-0.437,-0.5) 4(0.437,-0.5) 5(0.437,0) 6(0.437,0.5)
  silkscreen extent -0.96,-0.85 0.58,0.85, body extent -0.54,-0.8 0.55,0.8, height 0.86
Fuse-1812_ [mm]
  rect 1.78x3.2 smd: 1(-2.49,0) 2(2.49,0)
  silkscreen extent -1.75,-1.8 1.85,1.8, body extent -2.36,-1.74 2.37,1.74, height 1.03
"GW CS8PM1.PM-LRLT-XX52-1-350-R18" [mm]
  rect 0.5x2.8 smd paste+0 mask+0.05: 1(-1.095,-0.008) 2(1.105,-0.007)
  rect 1x2.8 smd paste+0 mask+0.05: 3(0.005,-0.008)
  silkscreen extent -1.65,-1.66 1.91,1.64, body extent -1.53,-1.48 1.48,1.52, height 2.32
HDR1X3_ [mm] "Connector; Header; 3 Position"
  rect 1.5x1.5 hole 0.9: 1(0,0)
  round 1.5 hole 0.9: 2(2.54,0) 3(5.08,0)
  silkscreen extent -1.27,-1.27 6.35,1.27, body extent -1.27,-1.24 6.35,1.25, height 8.54
IHLP3232DZER6R8M11 [mil]
  rect 95x210 smd: 1(-142.5,0) 2(142.5,0)
  silkscreen extent -170,-161 170,161, body extent -170,-161 170,161, height 157
"IND-0603 (1608 Metric)" [mm] "0.063\" L x 0.032\" W (1.60mm x 0.80mm)"
  rect 0.6x0.8 smd: 1(-0.7,0) 2(0.7,0)
  silkscreen extent -0.2,-0.46 0.23,0.46, body extent -0.8,-0.4 0.8,0.4, height 0.78
Ind-0805 [mm] "Inductor 0805"
  rect 1.2x1.32 smd: 1(-1,0) 2(1,0)
  silkscreen extent -0.25,-0.69 0.25,0.69, body extent -1,-0.62 1,0.63, height 0.47
IND_VLCF5020T-220MR75-1 [mm]
  rect 0.5x0.5 smd paste-1 mask+0: 1(0,1.7) 2(0,-1.7)
  Top region: 2.45,1.85 2.45,0.65 -2.45,0.65 -2.45,1.85 -1.5,2.75 1.5,2.75
  Top region: 2.45,-1.85 1.5,-2.75 -1.5,-2.75 -2.45,-1.85 -2.45,-0.65 2.45,-0.65
  silkscreen extent -3.35,-2.65 2.5,2.65, body extent -2.5,-2.5 2.5,2.5, height 2
KH-GPS181804-WY [mm]
  round 2 hole 1.1 paste-2539.97 mask+0.05: 1(0,0)
  silkscreen extent -8.89,-10.02 9.02,7.89, body extent -9,-10.07 9,7.94, height 4.37
LED-0603 [mm]
  rect 0.5x1 smd: 1(-0.75,0) 2(0.75,0)
  silkscreen extent -1.12,-0.66 1.75,0.66, body extent -0.82,-0.37 0.82,0.36, height 0.68
LQP03TG2N2B02D [mil]
  rect 14.51x12.76 smd paste-3937.01 mask+2: 1(-10.6,-0.2) 2(11,-0.2)
  silkscreen extent -35,-16 27,15, body extent -12,-6 12,6, height 13
MC-146_ [mm]
  rect 1.2x0.6 smd: 1(-3.15,-0.45) 2(3.15,-0.45) 3(3.15,0.45) 4(-3.15,0.45)
  silkscreen extent -4.01,-0.81 2.31,0.81, body extent -3.35,-0.75 3.55,0.75, height 1.45
MicroSMP [mm]
  rect 2x1.1 smd paste+0 mask+0.051: 1(-0.95,0)
  rect 0.8x0.8 smd paste+0 mask+0.051: 2(0.95,0)
  silkscreen extent -1.09,-0.76 1.75,0.76, body extent -1.25,-0.65 1.25,0.65, height 0.66
PB-621SR13-TF [mm]
  rect 1.6x1.4 smd: 1(-4.85,0) 2(4.85,0)
  silkscreen extent -5.37,-3.45 5.53,3.45, body extent -5.29,-3.35 5.29,3.35, height 2.9
PC817C [mm]
  rect 2x1.8 smd paste+0 mask+0.051: 1(-5.1,1.27) 2(-5.1,-1.27) 3(5.1,-1.27) 4(5.1,1.27)
  silkscreen extent -6.4,-2.29 3.32,2.31, body extent -5.15,-2.3 5.15,2.3, height 4.64
PCF8563T/F4,118 [mm]
  rect 1.55x0.7 smd: 1(-2.73,1.928) 2(-2.73,0.658) 3(-2.73,-0.612) 4(-2.73,-1.882) 5(2.72,-1.882) 6(2.72,-0.612) 7(2.72,0.658) 8(2.72,1.928)
  silkscreen extent -3.51,-2.43 1.59,2.63, body extent -3,-2.41 3,2.49, height 1.44
Q22FA12800078_ [mm] "37.4MHz SMD Crystal Resonator 9pF 60O ±10ppm -40?~+85? SMD2016-4P Crystals"
  rect 0.95x0.85 smd: 1(-0.725,-0.575) 2(0.725,-0.575) 3(0.725,0.575) 4(-0.725,0.575)
  silkscreen extent -1.42,-0.84 0.05,0.86, body extent -1.02,-0.78 0.98,0.82, height 0.65
Res-0402 [mil]
  rect 18x25 smd mask+2.17: 1(-18.5,0) 2(18.5,0)
  silkscreen extent -32,-17 32,16, body extent -23,-11 23,11, height 16
Res-0603 [mil]
  rect 30x35 smd: 1(-30,0) 2(30,0)
  silkscreen extent -48,-21 48,21, body extent -31,-17 31,17, height 18
RES-0805 [mil] "SMD 0805"
  rect 40x50 smd: 1(-40,0) 2(40,0)
  silkscreen extent -64,-29 64,29, body extent -39,-25 39,24, height 24
Res-0805 [mil] "SMD 0805"
  rect 40x50 smd: 1(-40,0) 2(40,0)
  silkscreen extent -64,-29 64,29, body extent -39,-25 39,24, height 24
RES-2010 [mm]
  rect 0.9x2.8 smd: 1(-2.35,0) 2(2.35,0)
  silkscreen extent -2.92,-1.52 2.92,1.52, body extent -2.5,-1.25 2.5,1.25, height 0.6
Res_1210 [mm]
  rect 1.14x2.72 smd: 1(-1.49,0) 2(1.49,0)
  silkscreen extent -2.16,-1.45 2.16,1.45, body extent -1.6,-1.25 1.6,1.25, height 0.7
RVT1E100M0405_ [mm] "10uF 25V 5.4mm SMD"
  rect 2.6x1.6 smd: 1(-1.8,0) 2(1.8,0)
  silkscreen extent -3.1,-2.22 2.16,2.22, body extent -2.65,-2.15 2.65,2.15, height 5.7
RVT1H1R0M0405 [mm]
  rect 2.8x1.1 smd paste+0 mask+0.051: 1(-1.66,0) 2(1.66,0)
  silkscreen extent -3.13,-2.28 2.24,2.28, body extent -2.65,-2.16 2.65,2.14, height 5.42
RVT1H101M0607 [mm]
  rect 3.5x1.6 smd: 1(-2.8,0) 2(2.8,0)
  silkscreen extent -4.17,-3.33 3.32,3.33, body extent -3.31,-3.33 3.29,3.27, height 7.94
SC-74A [mm]
  rect 1x0.6 smd: 1(-1.3,0.95) 2(-1.3,0) 3(-1.3,-0.95) 4(1.3,-0.95) 5(1.3,0.95)
  silkscreen extent -2.12,-1.47 0.9,1.47, body extent -1.45,-1.39 1.45,1.39, height 1.2
SMA [mm]
  rect 2.5x1.7 smd: 1(-2,0) 2(2,0)
  silkscreen extent -4.44,-1.42 2.06,1.42, body extent -2.6,-1.3 2.6,1.3, height 2.4
SMA(DO-214AC) [mm]
  rect 1.6x2.8 smd: 1(-1.9,0) 2(1.9,0)
  silkscreen extent -3.99,-1.6 2.84,1.6, body extent -2.6,-1.45 2.6,1.45, height 2.3
SOD-123 [mm]
  rect 0.95x0.9 smd: 1(-1.575,0) 2(1.575,0)
  silkscreen extent -1.37,-0.8 2.82,0.8, body extent -1.82,-0.78 1.83,0.78, height 1.5
SOD-323 [mm]
  rect 0.8x0.9 smd mask+0.055: 1(-1.15,0) 2(1.15,0)
  silkscreen extent -2.01,-0.79 0.94,0.79, body extent -1.3,-0.68 1.3,0.67, height 1.1
SOIC127P600X175-8N [mil]
  rect 67x21 smd: 1(-102,75) 2(-102,25) 3(-102,-25) 4(-102,-75) 5(102,-75) 6(102,-25) 7(102,25) 8(102,75)
  silkscreen extent -66,-98 66,98, body extent -119,-98 118,95, height 64
"SOIC-8(0.154\", 3.90mm Width)" [mm]
  rect 1.55x0.6 smd: 1(-2.7,1.905) 2(-2.7,0.635) 3(-2.7,-0.635) 4(-2.7,-1.905) 5(2.7,-1.905) 6(2.7,-0.635) 7(2.7,0.635) 8(2.7,1.905)
  silkscreen extent -3.79,-2.51 1.8,2.51, body extent -3.01,-2.45 3.01,2.45, height 1.63
SOIC-14 [mm]
  rect 1.62x0.67 smd: 1(-2.7,3.81) 2(-2.7,2.54) 3(-2.7,1.27) 4(-2.7,0) 5(-2.7,-1.27) 6(-2.7,-2.54) 7(-2.7,-3.81) 8(2.7,-3.81) 9(2.7,-2.54) 10(2.7,-1.27) 11(2.7,0) 12(2.7,1.27) 13(2.7,2.54) 14(2.7,3.81)
  silkscreen extent -3.84,-4.37 1.88,4.37, body extent -3.01,-4.33 3.01,4.33, height 1.75
"Solder Bridge" [mil] "Solder Bridge ON"
  rect 30x35 smd: 1(-30,0) 2(30,0)
  silkscreen extent -50,-22 50,22
"Solder Bridge 0402" [mil]
  rect 18x25 smd mask+2.17: 1(-18.5,0) 2(18.5,0)
  silkscreen extent -32,-17 32,16
SOT-23 [mm] "TRANS NPN 40V 0.6A SOT23"
  rect 0.82x0.92 smd: 1(-0.95,-1) 2(0.95,-1) 3(0,1)
  silkscreen extent -1.68,-1.3 1.55,0.81, body extent -1.5,-1.25 1.5,1.25, height 1.05
SOT-23-5 [mm]
  rect 1.1x0.6 smd: 1(-1.3,0.95) 2(-1.3,0) 3(-1.3,-0.95) 4(1.3,-0.95) 5(1.3,0.95)
  silkscreen extent -2.13,-1.5 0.88,1.5, body extent -1.4,-1.45 1.4,1.45, height 1.45
"SOT- 223" [mm]
  rect 1.5x2 smd: 1(-2.3,-3.05) 2(0,-3.05) 3(2.3,-3.05)
  rect 3.8x2 smd: 4(0,3.05)
  silkscreen extent -3.35,-3.2 3.3,1.8, body extent -3.25,-3.5 3.25,3.5, height 1.61
SPH4018H3R3MT_ [mm]
  rect 1.1x3.7 smd: 1(-1.5,0) 2(1.5,0)
  silkscreen extent -1.88,-2.03 1.88,2.03, body extent -2,-2 2,2, height 2
TC33X-2-104E_ [mm]
  rect 1.2x1.2 smd: 1(0,0) 3(2,0)
  rect 1.6x1.5 smd: 2(1,2.55)
  silkscreen extent -1.09,-0.71 2.83,3.15, body extent -0.76,-0.64 2.84,3.32, height 1.13
"Test-point - 0.5mm" [mm]
  oct 1x1 smd: 1(0,0)
  silkscreen extent -0.68,-0.68 0.68,0.68
TF31-30S-0.5SH(800) [mm]
  rect 0.3x1.3 smd: 1(-7.25,1.625) 2(-6.75,1.625) 3(-6.25,1.625) 4(-5.75,1.625) 5(-5.25,1.625) 6(-4.75,1.625) 7(-4.25,1.625) 8(-3.75,1.625) 9(-3.25,1.625) 10(-2.75,1.625) 11(-2.25,1.625) 12(-1.75,1.625) 13(-1.25,1.625) 14(-0.75,1.625) 15(-0.25,1.625) 16(0.25,1.625) 17(0.75,1.625) 18(1.25,1.625) 19(1.75,1.625) 20(2.25,1.625) 21(2.75,1.625) 22(3.25,1.625) 23(3.75,1.625) 24(4.25,1.625) 25(4.75,1.625) 26(5.25,1.625) 27(5.75,1.625) 28(6.25,1.625) 29(6.75,1.625) 30(7.25,1.625)
  rect 1.9x2.2 smd: S1(9.2,-1.625) S2(-9.2,-1.625)
  silkscreen extent -9.65,-4.08 9.65,1.78, body extent -9.65,-4.06 9.65,1.69, height 2.02
TF-109 [mm]
  rect 0.8x1.24 smd paste+0 mask+0.051: 1(2.9,-6.378) 2(1.8,-6.378) 3(0.7,-6.378) 4(-0.4,-6.378) 5(-1.5,-6.378) 6(-2.6,-6.378) 7(-3.7,-6.378) 8(-4.8,-6.378)
  rect 1.25x1.25 smd paste+0 mask+0.051: 9(-6.695,-3.748)
  rect 1.2x1.2 smd paste+0 mask+0.051: 10(-6.695,5.252)
  rect 1.5x1.15 smd paste+0 mask+0.051: 11(-4.94,6.378) 12(2.96,6.378)
  rect 1.15x2.2 smd paste+0 mask+0.051: 13(7.145,5.583) 15(-7.145,-5.897)
  rect 1.15x2.5 smd paste+0 mask+0.051: 14(7.145,-5.748)
  Keep-Out Layer region: -5.588,-5.486 3.612,-5.486 3.612,1.424 -5.588,1.424
  silkscreen extent -7.13,-8.24 7.6,6.82, body extent -7.47,-8.19 7.47,6.76, height 1.5
TPS61161ADRVR [mm]
  rect 0.6x0.35 smd: 1(-1.05,0.65) 2(-1.05,0) 3(-1.05,-0.65) 4(1.05,-0.65) 5(1.05,0) 6(1.05,0.65)
  rect 1.1x1.7 smd: 7(0,0)
  silkscreen extent -1.48,1.2 -1.23,1.45, body extent -1.05,-1 1.05,1, height 0.8
TSOT-23-6 [mm]
  rect 1.22x0.62 smd: 1(-1.2,0.95) 2(-1.2,0) 3(-1.2,-0.95) 4(1.2,-0.95) 5(1.2,0) 6(1.2,0.95)
  silkscreen extent -2.09,-1.5 0.86,1.5, body extent -1.41,-1.45 1.41,1.45, height 1
TYPE-C-31-M-12_ [mm]
  rect 0.6x1.2 smd: A1/B12(-3.2,2.375) A4/B9(-2.4,2.375) B1/A12(3.2,2.375) B4/A9(2.4,2.375)
  rect 0.3x1.2 smd: A5(-1.25,2.375) A6(-0.25,2.375) A7(0.25,2.375) A8(1.25,2.375) B5(1.75,2.375) B6(0.75,2.375) B7(-0.75,2.375) B8(-1.75,2.375)
  round 0 hole 0.62 unplated: MH(-2.89,1.305) MH(2.89,1.305)
  oval 0.9x2 hole 0.6 slot 1.7 at 90 deg: S1(4.325,1.805) S4(-4.325,1.805)
  oval 0.9x1.7 hole 0.6 slot 1.4 at 90 deg: S2(4.325,-2.375) S3(-4.325,-2.375)
  silkscreen extent -4.5,-3.57 4.5,0.44, body extent -4.47,-5.01 4.47,2.89, height 3.31
U-A-24DD-Y-14 [mm]
  oval 2.4x1.8 hole 0.762 slot 1.4 at 0 deg: 1(-3.5,3.6) 4(3.5,3.6)
  round 1.8 hole 0.92: 2(-1,3.6) 3(1,3.6)
  oval 1.3x2.4 hole 0.62 slot 1.4 at 90 deg: MH1(6.45,-3.6) MH2(-6.45,-3.6)
  silkscreen extent -6.6,-5.68 6.6,4.93, body extent -7.2,-6.13 7.2,3.87, height 7.17
U.FL-R-SMT-1(80)_ [mm]
  rect 1.02x1.07 smd: 1(0,-0.974)
  rect 1.07x2.2 smd: 2(1.475,0.974) 3(-1.475,0.974)
  silkscreen extent -1.22,-1.09 1.22,2.21, body extent -1.47,-0.74 1.53,2.36, height 1.2
VH-2A [mm]
  round 2.6 hole 1.8 paste-2539.97 mask+0.051: 1(1.981,0) 2(-1.981,0)
  silkscreen extent -4,-11.6 4,-0.75, body extent -3.96,-11.75 3.96,0.55, height 8.5
VSSOP-10 [mm]
  rect 1.45x0.3 smd paste+0 mask+0.05: 1(-2.2,1) 2(-2.2,0.5) 3(-2.2,0) 4(-2.2,-0.5) 5(-2.2,-1) 6(2.2,-1) 7(2.2,-0.5) 8(2.2,0) 9(2.2,0.5) 10(2.2,1)
  silkscreen extent -3.18,-1.55 1.47,1.55, body extent -2.45,-1.5 2.45,1.5, height 1.07
W3006_ [mm]
  rect 1.7x2.8 smd: 1(-4.55,0) 2(4.55,0)
  silkscreen extent -5.54,-1.68 5.05,1.73, body extent -5.05,-1.6 5.05,1.6, height 1.6
YSPI1050-4R7M [mm]
  rect 2.924x3.5 smd paste+0 mask+0.051: 1(-5.18,0) 2(5.18,0)
  silkscreen extent -5.74,-5.3 5.75,5.3, body extent -5.75,-5.25 5.75,5.25, height 4.13